# Altium PCB BLDC-Driver-v2.0.PcbDoc (part 5 of 6)
Units mil, origin at the board's own origin, x right, y up, seen from the top; angles counter-clockwise.
Board outline 5905.51 x 4330.71 mil, 4 copper layers (Top Layer, Layer 1, Layer 2, Bottom Layer), stack 62.047 mil thick; 284 components, 198 nets, 819 pads, 521 vias.
Unrouted connection lines stored in the file: 1.
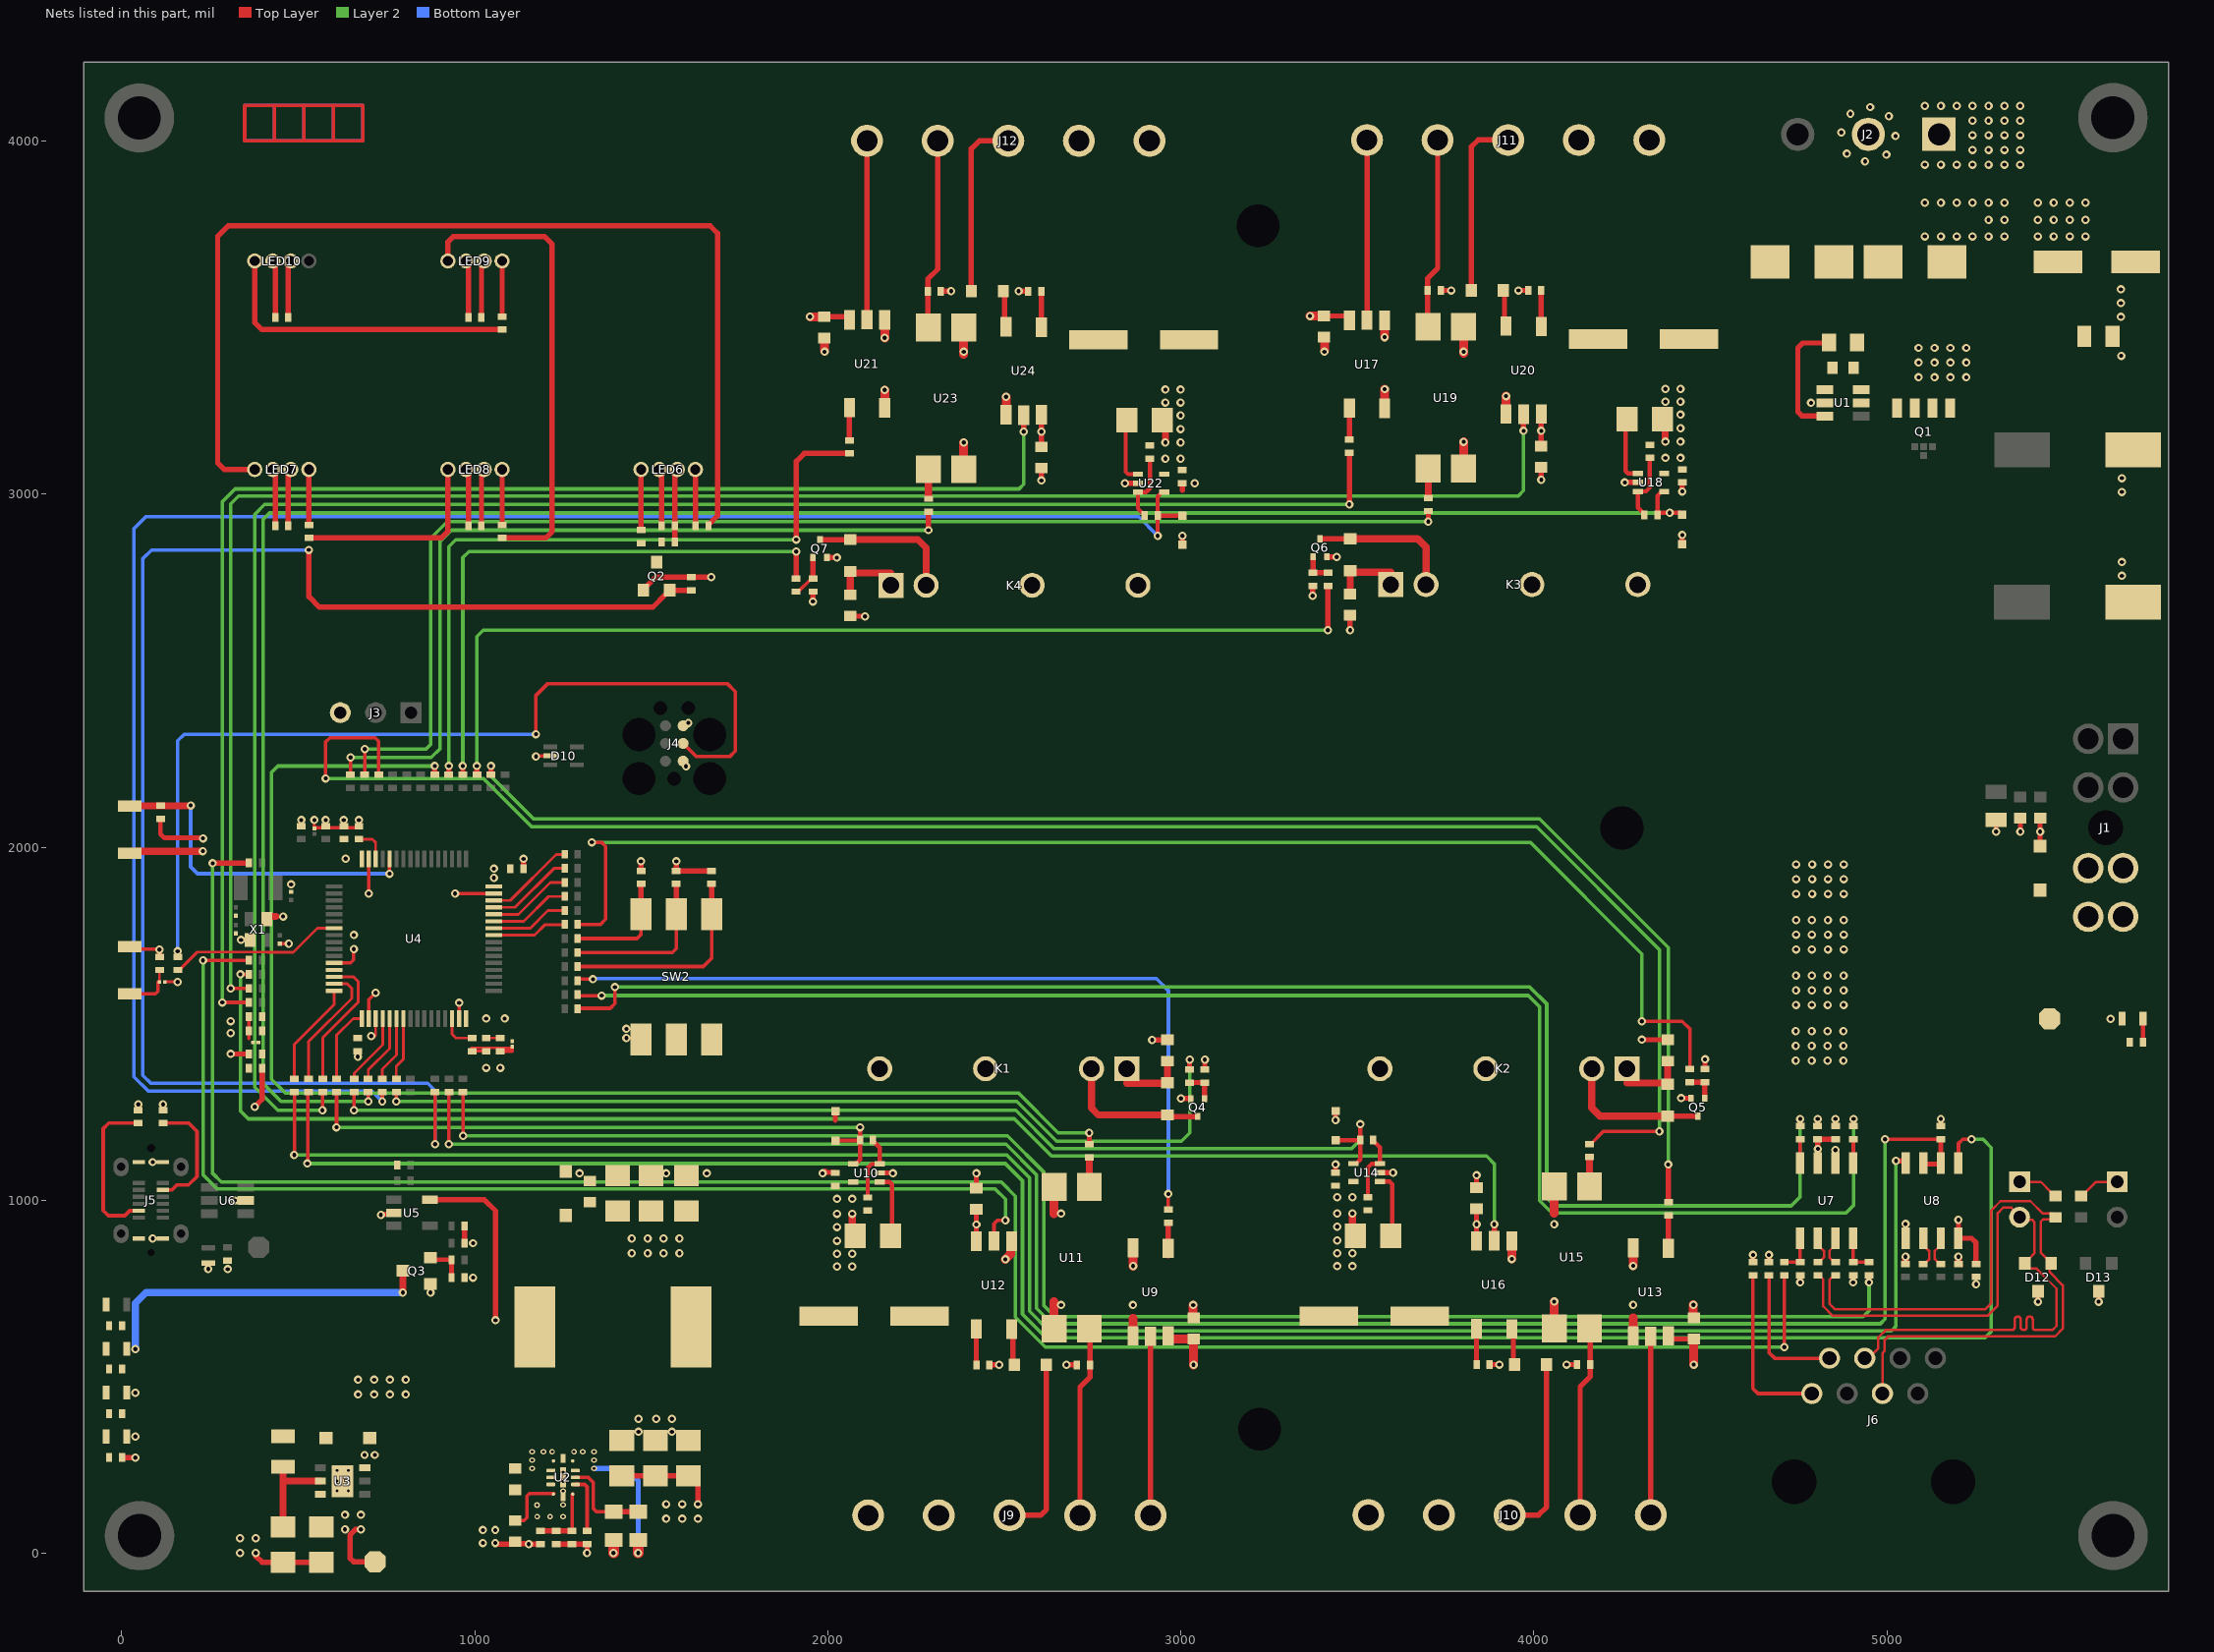
[diagram p4: the nets of this part, all layers, seen from the top]

## Via types
v1: diameter 23.62, hole 11.81, Top Layer to Bottom Layer, tented both sides, 497 vias
v2: diameter 15.75, hole 7.87, Top Layer to Bottom Layer, 24 vias

## Nets (pads, with @x,y where several pads share a name; then routed paths per layer and width w, separated by ;. In a path a pad name is that pad's centre, name@x,y a point inside that pad or via, vN(x,y) a via of type N, cw(c..) or ccw(c..) an arc to the next point about the centre after c; other vN are vias at no path point) (continued)
GND: (continued)
  Top Layer w25: v1@1991.08,3405.41 C60.2@1991.08,3441.37 ; v1(2161.48,3442.59) U21.4@2161.48,3493.42 ; U21.3@2161.66,3244.41 v1(2161.66,3295.25) ; U23.2@2385.26,3070.46 v1(2385.26,3146.25) ; v1@2385.26,3396.25 v1(2385.26,3403.25) U23.3@2385.26,3472.04 ; v1(2503.32,832.83) 2517.72,847.23 2517.72,880.51 U12.4@2520.88,883.67 ; U24.4@2505.36,3224.89 v1(2505.36,3275.73) ; U11.3@2640.98,636.52 2640.98,712.31 ; 2640.98,962.31 U11.2@2640.98,1038.1 ; U9.3@2864.58,864.14 2864.58,814.09 v1(2864.97,813.7) ; U9.4@2864.75,615.13 2864.75,665.97 ; C50.2@3035.16,667.19 v1(3035.16,703.14) ; v1@3407.06,3407.56 C55.2@3407.06,3443.51 ; v1(3577.46,3444.73) U17.4@3577.46,3495.57 ; U17.3@3577.64,3246.56 v1(3577.64,3297.39) ; U19.2@3801.24,3072.6 v1(3801.24,3148.39) ; v1@3801.24,3398.39 v1(3801.24,3403.25) U19.3@3801.24,3474.18 ; U20.4@3921.34,3227.03 v1(3921.34,3277.87) ; v1(3937.72,833.69) U16.4@3937.72,884.53 ; U15.3@4057.82,637.38 v1(4057.82,713.17) ; 4057.82,963.17 U15.2@4057.82,1038.96 ; v1(4281.42,814.16) U13.3@4281.42,865 ; U13.4@4281.6,615.99 4281.6,666.83 ; C45.2@4452,668.05 v1(4452,704)
  Top Layer w30: v1(1393.39,0.7) R6.1@1393.39,37.78
  Bottom Layer w10: 432.21,4100.78 432.21,4001.32 ; 515.87,4001.32 515.87,4100.78 ; 599.53,4001.32 599.53,4100.78 ; 683.2,4100.78 683.2,4001.32 432.21,4001.32 ; 683.2,4101.57 348.55,4101.57 348.55,4001.32 432.21,4001.32
  other v1: 335,0.77 380,0.77 1023.36,29.28 1058.36,29.28 335,42.41 380,42.41 1023.36,65.92 1058.36,65.92 1542.65,97.78 1587.65,97.78 1632.65,97.78 1542.65,139.42 1587.65,139.42 688.14,278.61 717.14,278.61 38.99,330.87 38.99,454.99 2660.98,703.14 2864.75,703.14 4281.6,704 874.98,738.82 5252.96,762.15 995.68,780.88 300.37,804.82 245.37,805.54 2026.59,812.38 2069.65,812.38 3443.43,813.24 3486.49,813.24 2026.59,848.89 2069.65,848.89 3443.43,849.74 3486.49,849.74 2026.59,885.4 3443.43,886.25 88,891.57 2026.59,924.14 3443.43,925 4057.82,932.24 5052.96,933.01 2026.59,961.89 2660.98,962.31 3443.43,962.75 319.82,999.38 1297.05,1076.4 1542.53,1076.4 1657.47,1076.4 1985.6,1076.4 88,1108.11 4854.62,1141.97 47.13,1271.68 117.26,1271.68 1032.6,1375.09 1072.47,1375.09 668.93,1406.41 1429.75,1459.54 1429.75,1485.64 5633.64,1514.15 473.45,1726.87 338.03,1737.37 457.45,1803.9 944.52,1868.52 479.87,1894.64 230.49,2025 5434.27,2044 545.89,2077.09 577.88,2077.09 629.15,2077.09 672.14,2077.09 1605.33,2352.18 5665.61,2768.54 5665.61,2807.54 5666.04,3006.21 3039.65,3031.1 5666.04,3045.21 2999.65,3146.67 4415.63,3148.81 2999.65,3184.41 4415.63,3186.56 2999.65,3223.16 4415.63,3225.3 4785.29,3258.46 2956.58,3259.67 2999.65,3259.67 4372.57,3261.81 4415.63,3261.81 2956.58,3296.18 2999.65,3296.18 4372.57,3298.32 4415.63,3298.32 5663.79,3391.94 1991.08,3403.25 3407.06,3403.25 5662.72,3502.21 5662.72,3541.21 5662.72,3580.21 4938.4,3942.3 4998.71,3961.29 4886.81,3964.36 5024.8,4014.27 4870.8,4024.27 5005.78,4070.18 4896.89,4077.25 4952.8,4096.27
  other v2: 1177.03,103.78 1213.67,103.78 1250.41,103.78 1176.71,136.86 1250.41,137.48 1250.41,176.25 610.18,177.24 642.08,177.24 1250.57,203.19 610.18,204.79 642.08,204.79 1250.41,229.8 610.18,234.96 642.08,234.96 1194.78,287.72 1219.48,287.72 1281.35,287.72 1306.04,287.72
ID0: R34.1 R51.2 SW2.1 | length 599.6
  Top Layer w10: R51.2@1292.03,1661.96 1647.54,1661.96 1671.15,1685.57 SW2.1@1671.15,1810.1
  Top Layer w15: SW2.1@1671.15,1810.1 R34.1@1671.15,1896.22
ID1: R33.1 R52.2 SW2.2 | length 467.1
  Top Layer w10: R52.2@1292.03,1701.73 1560,1701.73 1571.15,1712.88 SW2.2@1571.15,1810.1
  Top Layer w15: SW2.2@1571.15,1810.1 R33.1@1571.15,1896.23
ID2: R32.1 R53.2 SW2.3 | length 327.4
  Top Layer w10: R53.2@1292.03,1741.49 1460.13,1741.49 1471.15,1752.51 SW2.3@1471.15,1810.1
  Top Layer w15: SW2.3@1471.15,1810.1 R32.1@1471.15,1896.22
LED: Q2.2 R14.1 R59.1 | length 4336.2
  Top Layer w10: v1(888,1159.07) R14.1@888,1305.21
  Top Layer w15: v1(530.48,2842) 530.48,2709.52 560,2680 1504.41,2680 1541.88,2717.47 1543.85,2717.47 1552.49,2726.11 Q2.2@1552.49,2728.08 ; Q2.2@1552.88,2727.69 R59.1@1613.97,2727.69
  Bottom Layer w10: v1(530.48,2842) 84.83,2842 60,2817.17 60,1353.99 82.8,1331.19 867.35,1331.19 888,1310.54 v1@888,1159.25
LED1_DIN: LED6.4 R61.2 | length 171.5
  Top Layer w15: R61.2@1471.43,2898.47 LED6.4@1471.43,3070.01
LED1_DOUT: LED7.4 R76.2 | length 3031.3
  Top Layer w15: LED7.4@376.94,3070.01 289.99,3070.01 272,3088 272,3730.46 301.34,3759.8 1667.23,3759.8 1688.09,3738.94 1688.09,2939.25 1662.37,2913.52 R76.2@1662.37,2910.02
LED2_DOUT: LED8.4 R88.2 | length 576.8
  Top Layer w15: R88.2@530.48,2876.06 905.69,2876.06 924.19,2894.56 LED8.4@924.19,3070.01
LED3_DOUT: LED9.4 R89.2 | length 1327.5
  Top Layer w15: LED9.4@924.19,3660.56 924.19,3714.6 939.59,3730 1197.35,3730 1219.27,3708.08 1219.27,2894.22 1201.11,2876.06 R89.2@1077.73,2876.06
LED4_DOUT: LED10.4 R90.2 | length 883.4
  Top Layer w15: LED10.4@376.94,3660.56 376.94,3486.36 397.24,3466.06 R90.2@1077.73,3466.06
LPTIM1_CH1_PC12: R56.2 R118.1 | length 2020.2
  Top Layer w15: R56.2@926.69,2205.24 v1(926.69,2230) ; v1(1911.09,2871.26) 1911.09,3093.09 1933.35,3115.35 R118.1@2061.57,3115.35
  Layer 2 w10: v1(926.69,2230) 926.69,2851.19 946.73,2871.23 v1(1911.09,2871.26)
MOT1_DIR: J9.4 R92.1 U11.4 | length 595.9
  Top Layer w15: J9.4@2714.57,92.8 2714.57,470.95 ; U11.4@2740.98,636.52 2742.93,634.57 R92.1@2742.93,533.87 ; R92.1@2742.76,533.71 2742.76,499.14 ; 2714.57,470.95 2742.76,499.14 ; 2714.57,470.95 2742.76,499.14
MOT1_FG: D16.1 J9.3 | length 521.1
  Top Layer w15: J9.3@2514.67,107.71 2602.97,107.71 2619.43,124.17 D16.1@2619.43,533.7
MOT1_PWR_NEG: C48.2 J9.2 R93.2 U10.1 | length 190.3
  Top Layer w12: U10.1@2147.45,1051.87 2175.13,1051.87 2182.16,1044.84 R93.2@2182.16,892.14
MOT1_PWR_POS: C48.1 J9.1 K1.8
MOT1_SPD: J9.5 U9.5 | length 522.3
  Top Layer w15: J9.5@2914.67,92.71 U9.5@2914.67,615
MOT1_SPEED: R50.2 R91.1 | length 2312.1
  Top Layer w10: R50.2@1293.53,1626.25 v1@1330.72,1626.25 ; R91.1@2964.67,973.21 2964.83,973.37 2964.83,1017.83 v1(2965,1018)
  Top Layer w15: R50.2@1292.03,1622.2 1292.03,1624.75 R50.2@1293.53,1626.25 ; v1@1330.72,1626.25 1332.67,1628.2 v1@1335,1628.2
  Bottom Layer w10: v1@1335,1628.2 2930.86,1628.2 2965,1594.06 v1(2965,1018)
  other v1: 1335,1626.2
MOT2_DIR: J10.4 R101.1 U15.4 | length 555.4
  Top Layer w15: J10.4@4131.41,93.66 4131.41,471.81 4159.61,500 4159.61,531.06 R101.1@4159.61,534.56 U15.4@4159.61,637.38
MOT2_FG: D19.1 J10.3 | length 517.5
  Top Layer w15: J10.3@3931.51,108.56 4013.6,108.56 4036.28,131.24 D19.1@4036.28,534.55
MOT2_PWR_NEG: C53.2 J10.2 R102.2 U14.1 | length 190.3
  Top Layer w12: U14.1@3564.29,1052.73 3591.97,1052.73 3599,1045.7 R102.2@3599,893
MOT2_PWR_POS: C53.1 J10.1 K2.8
MOT2_SPD: J10.5 U13.5 | length 521.4
  Top Layer w15: J10.5@4331.51,93.56 U13.5@4331.51,615
MOT2_SPEED: R42.2 R100.1 | length 4312
  Top Layer w15: R42.2@1045.98,2205.24 v1(1045.98,2230) ; v1(4380.83,1101.19) 4381.17,1100.85 4381.17,994.41 R100.1@4381.51,994.06
  Layer 2 w10: v1(1045.98,2230) 1045.98,2201.6 1166.97,2080.62 4016.39,2080.62 4381.51,1715.49 4381.51,1101.87 v1(4380.83,1101.19)
MOT3_DIR: J11.4 R110.1 U19.4 | length 555.4
  Top Layer w15: U19.4@3699.45,3474.18 R110.1@3699.45,3577 3699.45,3580.5 3699.45,3611.56 3727.65,3639.75 J11.4@3727.65,4017.89
MOT3_FG: D22.1 J11.3 | length 519.2
  Top Layer w15: D22.1@3822.78,3577 3822.78,3983.69 3842.57,4003.48 J11.3@3927.06,4003.48
MOT3_PWR_NEG: C58.2 J11.2 R111.2 U18.1 | length 190.3
  Top Layer w12: R111.2@4260.06,3218.56 4260.06,3065.86 4267.09,3058.83 U18.1@4294.76,3058.83
MOT3_PWR_POS: C58.1 J11.1 K3.8
MOT3_SPD: J11.5 U17.5 | length 521.4
  Top Layer w15: U17.5@3527.55,3496.56 J11.5@3527.55,4017.99
MOT3_SPEED: R13.2 R109.1 | length 5152.9
  Top Layer w10: v1(568.6,1254.89) 569.04,1255.33 569.04,1306.63 R13.2@569.48,1307.07
  Top Layer w15: v1(3477.55,2970.75) R109.1@3477.55,3117.49
  Layer 2 w10: v1(568.6,1254.89) 442.11,1254.89 376.86,1320.14 376.86,2942.7 404.91,2970.75 v1(3477.55,2970.75)
MOT4_DIR: J12.4 R119.1 U23.4 | length 555.4
  Top Layer w15: U23.4@2283.47,3472.04 R119.1@2283.47,3574.85 2283.47,3578.35 2283.47,3609.41 2311.67,3637.61 J12.4@2311.67,4015.75
MOT4_FG: D25.1 J12.3 | length 517.5
  Top Layer w15: D25.1@2406.8,3574.86 2406.8,3978.28 2429.37,4000.85 J12.3@2511.57,4000.85
MOT4_PWR_NEG: C63.2 J12.2 R120.2 U22.1 | length 190.3
  Top Layer w12: R120.2@2844.08,3216.41 2844.08,3063.72 2851.11,3056.69 U22.1@2878.78,3056.69
MOT4_PWR_POS: C63.1 J12.1 K4.8
MOT4_SPD: J12.5 U21.5 | length 521.4
  Top Layer w15: U21.5@2111.57,3494.41 J12.5@2111.57,4015.85
NetC3_1: C3.1 C4.2 C8.2 D1.2 J2.1 Q1.1 Q1.2 Q1.3 R1.2 U1.6
  other v1: 5090,3331 5135,3331 5180,3331 5225,3331 5090,3372.64 5135,3372.64 5180,3372.64 5225,3372.64 5090,3414.28 5135,3414.28 5180,3414.28 5225,3414.28 5108,3730 5153,3730 5198,3730 5243,3730 5288,3730 5333,3730 5428,3730 5473,3730 5518,3730 5563,3730 5288,3776.64 5333,3776.64 5428,3776.64 5473,3776.64 5518,3776.64 5563,3776.64 5108,3825.28 5153,3825.28 5198,3825.28 5243,3825.28 5288,3825.28 5333,3825.28 5428,3825.28 5473,3825.28 5518,3825.28 5563,3825.28 5108,3933.36 5153,3933.36 5198,3933.36 5243,3933.36 5288,3933.36 5333,3933.36 5378,3933.36 5243,3975 5288,3975 5333,3975 5378,3975 5243,4016.64 5288,4016.64 5333,4016.64 5378,4016.64 5243,4058.28 5288,4058.28 5333,4058.28 5378,4058.28 5108,4099.92 5153,4099.92 5198,4099.92 5243,4099.92 5288,4099.92 5333,4099.92 5378,4099.92
NetC8_1: C8.1 U1.1
NetC9_1: C9.1 L1.1 U2.3 U2.12
NetC9_2: C9.2 U2.4 | length 22.8
  Top Layer w7: C9.2@1114.86,180.12 C9.2@1125.38,190.64 ; U2.4@1208.09,195.11 U2.4@1215.96,195.11
NetC17_1: C17.1 R5.1 R7.2 U2.7 | length 192.6
  Top Layer w10: C17.1@1275.96,63.28 1275.96,166.03 U2.7@1277.73,167.8
  Top Layer w15: R7.2@1188.56,63.28 C17.1@1275.96,63.28
NetC18_2: C18.2 U2.5 | length 177.4
  Top Layer w10: C18.2@1114.86,92.78 1139.71,92.78 1148.32,101.38 1148.32,162.17 1155.76,169.61 U2.5@1224.79,169.61
NetC20_2: C20.2 F1.1 U3.2 | length 275.8
  Top Layer w20: 456.8,204.79 U3.2@562.73,204.79 ; F1.1@456.84,244.76 456.84,182.01 456.87,181.98 C20.2@456.87,74.85
NetC21_1: C21.1 U4.30 | length 105.2
  Top Layer w8: U4.30@936.14,1514.71 936.14,1470.8 947.35,1459.59 C21.1@992.79,1459.59
NetC22_1: C22.1 U4.62 | length 97.3
  Top Layer w8: C22.1@672.14,2022.59 710.61,2022.59 719.61,2013.59 U4.62@719.61,1967.47
NetD1_1: D1.1 D3.1
NetD14_2: D14.2 K1.2 Q4.3 | length 414.8
  Top Layer w15: D14.2@2967.44,1237.1 Q4.3@3045.77,1237.1
  Top Layer w20: K1.2@2747.23,1374.6 2747.23,1261.15 2766.42,1241.96 D14.2@2962.28,1241.96
NetD16_2: D16.2 U12.3 | length 108.4
  Top Layer w15: U12.3@2520.97,634.66 U12.3@2525.13,630.5 ; U12.3@2525.13,634.66 U12.3@2525.13,630.5 ; D16.2@2528.88,533.7 2525.13,537.45 U12.3@2525.13,630.5
NetD17_2: D17.2 K2.2 Q5.3 | length 413.9
  Top Layer w15: D17.2@4384.28,1237.96 Q5.3@4462.61,1237.96
  Top Layer w20: K2.2@4164.23,1372.57 4164.23,1261.85 4187.95,1238.12 D17.2@4379.28,1238.12
NetD19_2: D19.2 U16.3 | length 108.4
  Top Layer w15: U16.3@3937.81,635.52 U16.3@3941.97,631.35 ; U16.3@3941.97,635.52 U16.3@3941.97,631.35 ; D19.2@3945.72,534.55 3941.97,538.31 U16.3@3941.97,631.35
NetD20_2: D20.2 K3.2 Q6.3 | length 408.9
  Top Layer w15: Q6.3@3396.45,2873.6 D20.2@3474.78,2873.6
  Top Layer w20: D20.2@3479.78,2873.43 3671.11,2873.43 3694.83,2849.71 K3.2@3694.83,2743.99
NetD22_2: D22.2 U20.3 | length 108.4
  Top Layer w15: D22.2@3913.33,3577 3917.09,3573.25 U20.3@3917.09,3480.2 ; U20.3@3917.09,3476.04 U20.3@3917.09,3480.2 ; U20.3@3921.25,3476.04 U20.3@3917.09,3480.2
NetD23_2: D23.2 K4.2 Q7.3 | length 410.8
  Top Layer w15: Q7.3@1978.63,2870.56 D23.2@2058.8,2870.56
  Top Layer w20: D23.2@2063.8,2871.29 2255.13,2871.29 2278.85,2847.57 K4.2@2278.85,2741.84
NetD25_2: D25.2 U24.3 | length 108.4
  Top Layer w15: D25.2@2497.35,3574.86 2501.11,3571.1 U24.3@2501.11,3478.06 ; U24.3@2501.11,3473.9 U24.3@2501.11,3478.06 ; U24.3@2505.27,3473.9 U24.3@2501.11,3478.06
NetJ4_3: J4.3 R43.1 | length 2654.6
  Top Layer w10: v1(1173.72,2320) 1173.72,2430.18 1207.04,2463.5 1715.5,2463.5 1738.09,2440.91 1738.09,2272.15 1722.45,2256.5 1628.11,2256.5 J4.3@1590.56,2294.05
  Bottom Layer w10: v1(158.9,1705.49) 158.9,2301.59 177.32,2320 v1(1173.72,2320)
NetJ5_A5: J5.A5 R70.1 | length 450.3
  Top Layer w10: R70.1@47,1218.5 -36.46,1218.5 -52.19,1202.77 -52.19,971.06 -37.67,956.54 9.11,956.54 22.89,970.31 J5.A5@49.02,970.31
NetJ5_B5: J5.B5 R71.1 | length 346
  Top Layer w10: J5.B5@117.13,1029.37 142.68,1029.37 156.46,1043.15 189.56,1043.15 213.48,1067.07 213.48,1195.02 190,1218.5 R71.1@117.13,1218.5
NetJ6_7: J6.7 R77.2 | length 397
  Top Layer w10: R77.2@4666,787.78 4666,569.23 4682.56,552.67 J6.7@4837.61,552.67
NetJ6_8: J6.8 R78.2 | length 493.5
  Top Layer w10: R78.2@4621,787.78 4621,466.67 4635,452.67 J6.8@4787.62,452.67
NetJ7_1: J7.1 R81.1 | length 119.5
  Top Layer w7: J7.1@5376.11,1052.18 5436.11,1052.18 5464.49,1023.79 5464.49,1023.2 5475.99,1011.7 R81.1@5478.49,1011.7
NetJ8_1: J8.1 R86.1 | length 119.4
  Top Layer w7: R86.1@5549.91,1011.7 5552.41,1011.7 5563.91,1023.2 5563.91,1023.63 5592.46,1052.18 J8.1@5652.3,1052.18
NetLED1_1: LED1.1 R2.2 | length 65.9
  Top Layer w13.21: R2.2@5725.5,1448.24 LED1.1@5725.5,1514.15
NetLED2_1: LED2.1 R8.2
NetLED3_1: LED3.1 R9.2
NetLED4_1: LED4.1 R62.1
NetLED5_1: LED5.1 R64.1
NetLED5_2: LED5.2 Q3.3 | length 961.5
  Top Layer w20: v1(796.37,738.82) Q3.3@796.37,800.4
  Bottom Layer w20: v1(38.99,578.8) 38.99,708.99 68.82,738.82 v1(796.37,738.82)
NetLED6_1: LED6.1 R76.1 | length 160.2
  Top Layer w15: LED6.1@1624.97,3070.01 1625.17,3069.81 1625.17,2910.22 R76.1@1625.37,2910.02
NetLED7_1: LED7.1 R88.1 | length 156.9
  Top Layer w15: R88.1@530.48,2913.06 LED7.1@530.48,3070.01
NetLED8_1: LED8.1 R89.1 | length 156.9
  Top Layer w15: R89.1@1077.73,2913.06 LED8.1@1077.73,3070.01
NetLED9_1: LED9.1 R90.1 | length 157.5
  Top Layer w15: R90.1@1077.73,3503.06 LED9.1@1077.73,3660.56
NetQ1_4: Q1.4 U1.5
NetQ2_3: Q2.3 R60.1 R61.1
NetQ3_2: Q3.2 R66.2 R68.2 | length 126.6
  Top Layer w13.21: Q3.2@866.35,831.57 R66.2@934.51,831.57 ; Q3.2@875.11,837.8 Q3.2@881.35,831.57 ; R68.2@934.5,781.02 R66.2@934.51,830.59
NetQ4_1: Q4.1 R96.2 R98.2 | length 89.2
  Top Layer w15: R96.2@3024.98,1333.44 R98.2@3064.48,1333.44 ; R98.2@3062.66,1331.63 R98.2@3064.48,1333.44 ; Q4.1@3067.66,1288.01 R98.2@3067.66,1331.63 ; R98.2@3067.98,1333.44 R98.2@3064.48,1333.44
NetQ5_1: Q5.1 R105.2 R107.2 | length 89.2
  Top Layer w15: R105.2@4441.82,1334.3 R107.2@4481.32,1334.3 ; R107.2@4479.51,1332.49 R107.2@4481.32,1334.3 ; Q5.1@4484.51,1288.87 R107.2@4484.51,1332.49 ; R107.2@4484.82,1334.3 R107.2@4481.32,1334.3
NetQ6_1: Q6.1 R114.2 R116.2 | length 89.2
  Top Layer w15: R116.2@3374.24,2777.25 R116.2@3377.74,2777.25 ; R116.2@3374.55,2779.07 Q6.1@3374.55,2822.68 ; R116.2@3379.55,2779.07 R116.2@3377.74,2777.25 ; R114.2@3417.23,2777.25 R116.2@3377.74,2777.25
NetQ7_1: Q7.1 R123.2 R125.2 | length 123
  Top Layer w10: R123.2@1910.45,2723.99 1914.45,2727.99 1920.36,2727.99 1949.36,2756.99 1954.57,2756.99 R125.2@1958.57,2760.99
  Top Layer w15: R125.2@1958.57,2760.99 Q7.1@1958.57,2820.54
NetR1_1: R1.1 U1.3 | length 356.2
  Top Layer w15: U1.3@4824.31,3221.06 4760.06,3221.06 4748,3233.11 4748,3414.31 4762,3428.31 R1.1@4835.88,3428.31
NetR3_1: R3.1 R6.2 U2.9 | length 272
  Top Layer w10: U2.9@1284.86,214.8 1322.45,214.8 1336.43,200.82 1336.43,126.75 1344.96,118.22 1402.95,118.22 R6.2@1403.39,117.78
  Top Layer w15: R6.2@1403.39,117.78 R3.1@1473.25,117.78
NetR4_2: R4.2 U2.8 | length 161.5
  Top Layer w10: U2.8@1284.86,195.11 1311.68,195.11 1318.59,188.2 R4.2@1318.59,63.28
NetR72_1: R72.1 R73.2 U7.8 | length 112.6
  Top Layer w10: U7.8@4904.66,892.39 R72.1@4904.66,824.78 R73.2@4949.66,824.78
NetR74_2: R74.2 U7.1 | length 67.5
  Top Layer w10: U7.1@4905.16,1105.49 4905.16,1172.28 R74.2@4905.66,1172.78
NetR75_1: R75.1 U7.7 | length 84
  Top Layer w7: R75.1@4854.66,824.78 4849.16,830.28 4845.13,830.28 4837.78,837.63 4837.78,856.8 4854.66,873.69 U7.7@4854.66,892.39
NetR79_2: R79.2 U7.4 | length 67.8
  Top Layer w10: U7.4@4754.66,1104.99 R79.2@4754.66,1172.78
NetR80_1: R80.1 U7.6 | length 83.8
  Top Layer w7: R80.1@4804.66,824.78 4808.16,824.78 4821.78,838.39 4821.78,856.57 4804.66,873.69 U7.6@4804.66,892.39
NetR82_2: R82.2 R83.2 U7.5 | length 112.6
  Top Layer w10: R82.2@4709.66,824.78 R83.2@4754.66,824.78 U7.5@4754.66,892.39
NetR84_1: R84.1 U8.7 | length 77.1
  Top Layer w7: R84.1@5143.96,825.59 5136.07,833.48 5136.07,856.8 5152.96,873.69 U8.7@5152.96,892.39
NetR85_1: R85.1 U8.6 | length 89.4
  Top Layer w7: R85.1@5102.96,819.78 5108.46,825.28 5112.85,825.28 5120.07,832.5 5120.07,856.57 5102.96,873.69 U8.6@5102.96,892.39
NetR91_2: R91.2 U9.1 | length 93.1
  Top Layer w15: U9.1@2964.67,843.15 R91.2@2964.67,936.21
NetR94_2: R94.2 U11.1 | length 100.9
  Top Layer w20: U11.1@2740.98,1018.1 R94.2@2740.98,1118.99
NetR95_1: R95.1 R99.2 U10.3 | length 197.9
  Top Layer w12: R99.2@2113.45,1007.89 2113.45,1091.77 2124.44,1102.76 2147.16,1102.76 U10.3@2147.45,1103.05 2147.45,1149.01 2133.57,1162.89 2131.55,1162.89 2128.55,1165.89 R95.1@2128.55,1169.39
NetR97_1: R97.1 U12.1 | length 99
  Top Layer w15: R97.1@2420.97,536.6 U12.1@2420.97,635.65
NetR100_2: R100.2 U13.1 | length 93.1
  Top Layer w15: U13.1@4381.51,864.01 R100.2@4381.51,957.06
NetR103_2: R103.2 U15.1 | length 100.9
  Top Layer w20: U15.1@4157.82,1018.96 R103.2@4157.82,1119.85
NetR104_1: R104.1 R108.2 U14.3 | length 197.9
  Top Layer w12: R108.2@3530.3,1008.75 3530.3,1092.63 3541.28,1103.62 3564,1103.62 U14.3@3564.29,1103.91 3564.3,1149.87 3550.42,1163.75 3548.39,1163.75 3545.39,1166.75 R104.1@3545.39,1170.25
NetR106_1: R106.1 U16.1 | length 99
  Top Layer w15: R106.1@3837.81,537.46 U16.1@3837.81,636.51
NetR109_2: R109.2 U17.1 | length 93.1
  Top Layer w15: R109.2@3477.55,3154.49 U17.1@3477.55,3247.55
NetR112_2: R112.2 U19.1 | length 100.9
  Top Layer w20: R112.2@3701.23,2991.71 U19.1@3701.23,3092.6
NetR113_1: R113.1 R117.2 U18.3 | length 197.9
  Top Layer w12: R113.1@4313.66,2941.31 4313.66,2944.81 4310.66,2947.81 4308.64,2947.81 4294.76,2961.69 U18.3@4294.76,3007.65 4295.05,3007.94 4317.78,3007.94 4328.76,3018.93 R117.2@4328.76,3102.81
NetR115_1: R115.1 U20.1 | length 99
  Top Layer w15: U20.1@4021.25,3475.05 R115.1@4021.25,3574.09
NetR118_2: R118.2 U21.1 | length 93.1
  Top Layer w15: R118.2@2061.57,3152.35 U21.1@2061.57,3245.4
NetR121_2: R121.2 U23.1 | length 100.9
  Top Layer w20: R121.2@2285.25,2989.57 U23.1@2285.25,3090.46
NetR122_1: R122.1 R126.2 U22.3 | length 197.9
  Top Layer w12: R122.1@2897.68,2939.17 2897.68,2942.67 2894.68,2945.67 2892.66,2945.67 2878.78,2959.55 U22.3@2878.78,3005.51 2879.07,3005.8 2901.8,3005.8 2912.78,3016.78 R126.2@2912.78,3100.67
NetR124_1: R124.1 U24.1 | length 99
  Top Layer w15: U24.1@2605.27,3472.91 R124.1@2605.27,3571.95
NRST_MCU: C31.2 D9.2 R43.2 SW1.1 U4.7 | length 646.4
  Top Layer w6: D9.2@102.58,1618.48 D9.2@107.2,1618.48 C31.2@107.2,1652.31
  Top Layer w8: R43.2@153,1652.31 163.23,1652.31 163.23,1653.03 167.5,1657.31 168.23,1657.31 214.04,1703.12 411.57,1703.12 412.36,1702.33 486.49,1702.33 554.78,1770.62 U4.7@601.5,1770.62
  Top Layer w10: SW1.1@22.71,1584.57 95.09,1584.57 102.58,1592.06 D9.2@102.58,1618.48
PA0: R13.1 U4.14 | length 391.3
  Top Layer w8: R13.1@569.48,1343.95 569.48,1460.75 669.95,1561.22 669.95,1619.71 656.83,1632.82 U4.14@601.5,1632.82
PA1: R15.1 U4.15 | length 362.6
  Top Layer w8: R15.1@529.71,1343.95 R15.1@529.71,1344.07 529.71,1449.79 651.95,1572.03 651.95,1600.03 638.83,1613.14 U4.15@601.5,1613.14
PA2: R17.1 U4.16 | length 295.9
  Top Layer w8: R17.1@489.61,1343.95 R17.1@489.61,1344.07 489.61,1442.06 601.5,1553.95 U4.16@601.5,1593.45
PA3: R19.1 U4.17 | length 214.6
  Top Layer w8: R19.1@608.97,1343.95 608.97,1467.92 655.77,1514.71 U4.17@680.24,1514.71
PA4: R21.1 U4.20 | length 204.1
  Top Layer w8: R21.1@658.74,1343.94 658.75,1360.26 739.29,1440.79 U4.20@739.29,1514.71
PA5: R23.1 U4.21 | length 195.8
  Top Layer w8: R23.1@698.5,1343.94 698.5,1369.34 758.98,1429.82 U4.21@758.98,1514.71
PA6: R25.1 U4.22 | length 187.5
  Top Layer w8: R25.1@738.26,1343.94 738.26,1370.92 778.66,1411.32 U4.22@778.66,1514.71
PA7: R27.1 U4.23 | length 179.2
  Top Layer w8: R27.1@778.03,1343.94 778.03,1379.19 798.35,1399.51 U4.23@798.35,1514.71
PA8: R29.1 U4.41 | length 213.2
  Top Layer w8: U4.41@1054.25,1750.94 1169.46,1750.94 1199.38,1780.85 R29.1@1255.03,1780.85
PA9: R31.1 U4.42 | length 221.5
  Top Layer w8: U4.42@1054.25,1770.62 1157.65,1770.62 1207.65,1820.62 R31.1@1255.03,1820.62
PA10: R35.1 U4.43 | length 229.8
  Top Layer w8: U4.43@1054.25,1790.31 1139.15,1790.31 1209.22,1860.38 R35.1@1255.03,1860.38
PA11: R36.1 U4.44 | length 238.1
  Top Layer w8: U4.44@1054.25,1809.99 1124.18,1809.99 1214.33,1900.14 R36.1@1255.03,1900.14
PA12: R37.1 U4.45 | length 246.4
  Top Layer w8: U4.45@1054.25,1829.68 1114.44,1829.68 1224.68,1939.91 R37.1@1255.03,1939.91
PA13: R39.1 U4.46 | length 254.7
  Top Layer w8: U4.46@1054.25,1849.36 1100.87,1849.36 1231.18,1979.67 R39.1@1255.03,1979.67

## Text inside footprints (layer, text, board x,y; h text height)
C48: Top Overlay "+" at 1934.87,704.45 h25
C53: Top Overlay "+" at 3351.71,704.45 h25
C58: Top Overlay "+" at 4507.35,3407.11 h25 r180
C63: Top Overlay "+" at 3091.36,3404.97 h25 r180
J1: Top Overlay "1" at 5661.05,2375.11 h31.5 r270
J5: Top Overlay "A1" at 53.07,851.84 h19.68 r90; Top Overlay "B1" at 132.07,1123.84 h19.68 r90
SW2: Top Overlay "3" at 1481.15,1705.22 h35.43; Top Overlay "2" at 1579.15,1706.22 h35.43; Top Overlay "1" at 1678.15,1707.22 h35.43; Top Overlay "ON" at 1710.15,1555.93 h30 r180